# Altium PCB da12_v100.PcbDoc (part 5 of 5)
Units mil, origin at the board's own origin, x right, y up, seen from the top; angles counter-clockwise.
Board outline 4646.03 x 3622.4 mil, 4 copper layers (Top Layer, GND, POWER, Bottom Layer), stack 23.756 mil thick; 376 components, 191 nets, 1000 pads, 352 vias.
Unrouted connection lines stored in the file: 152.
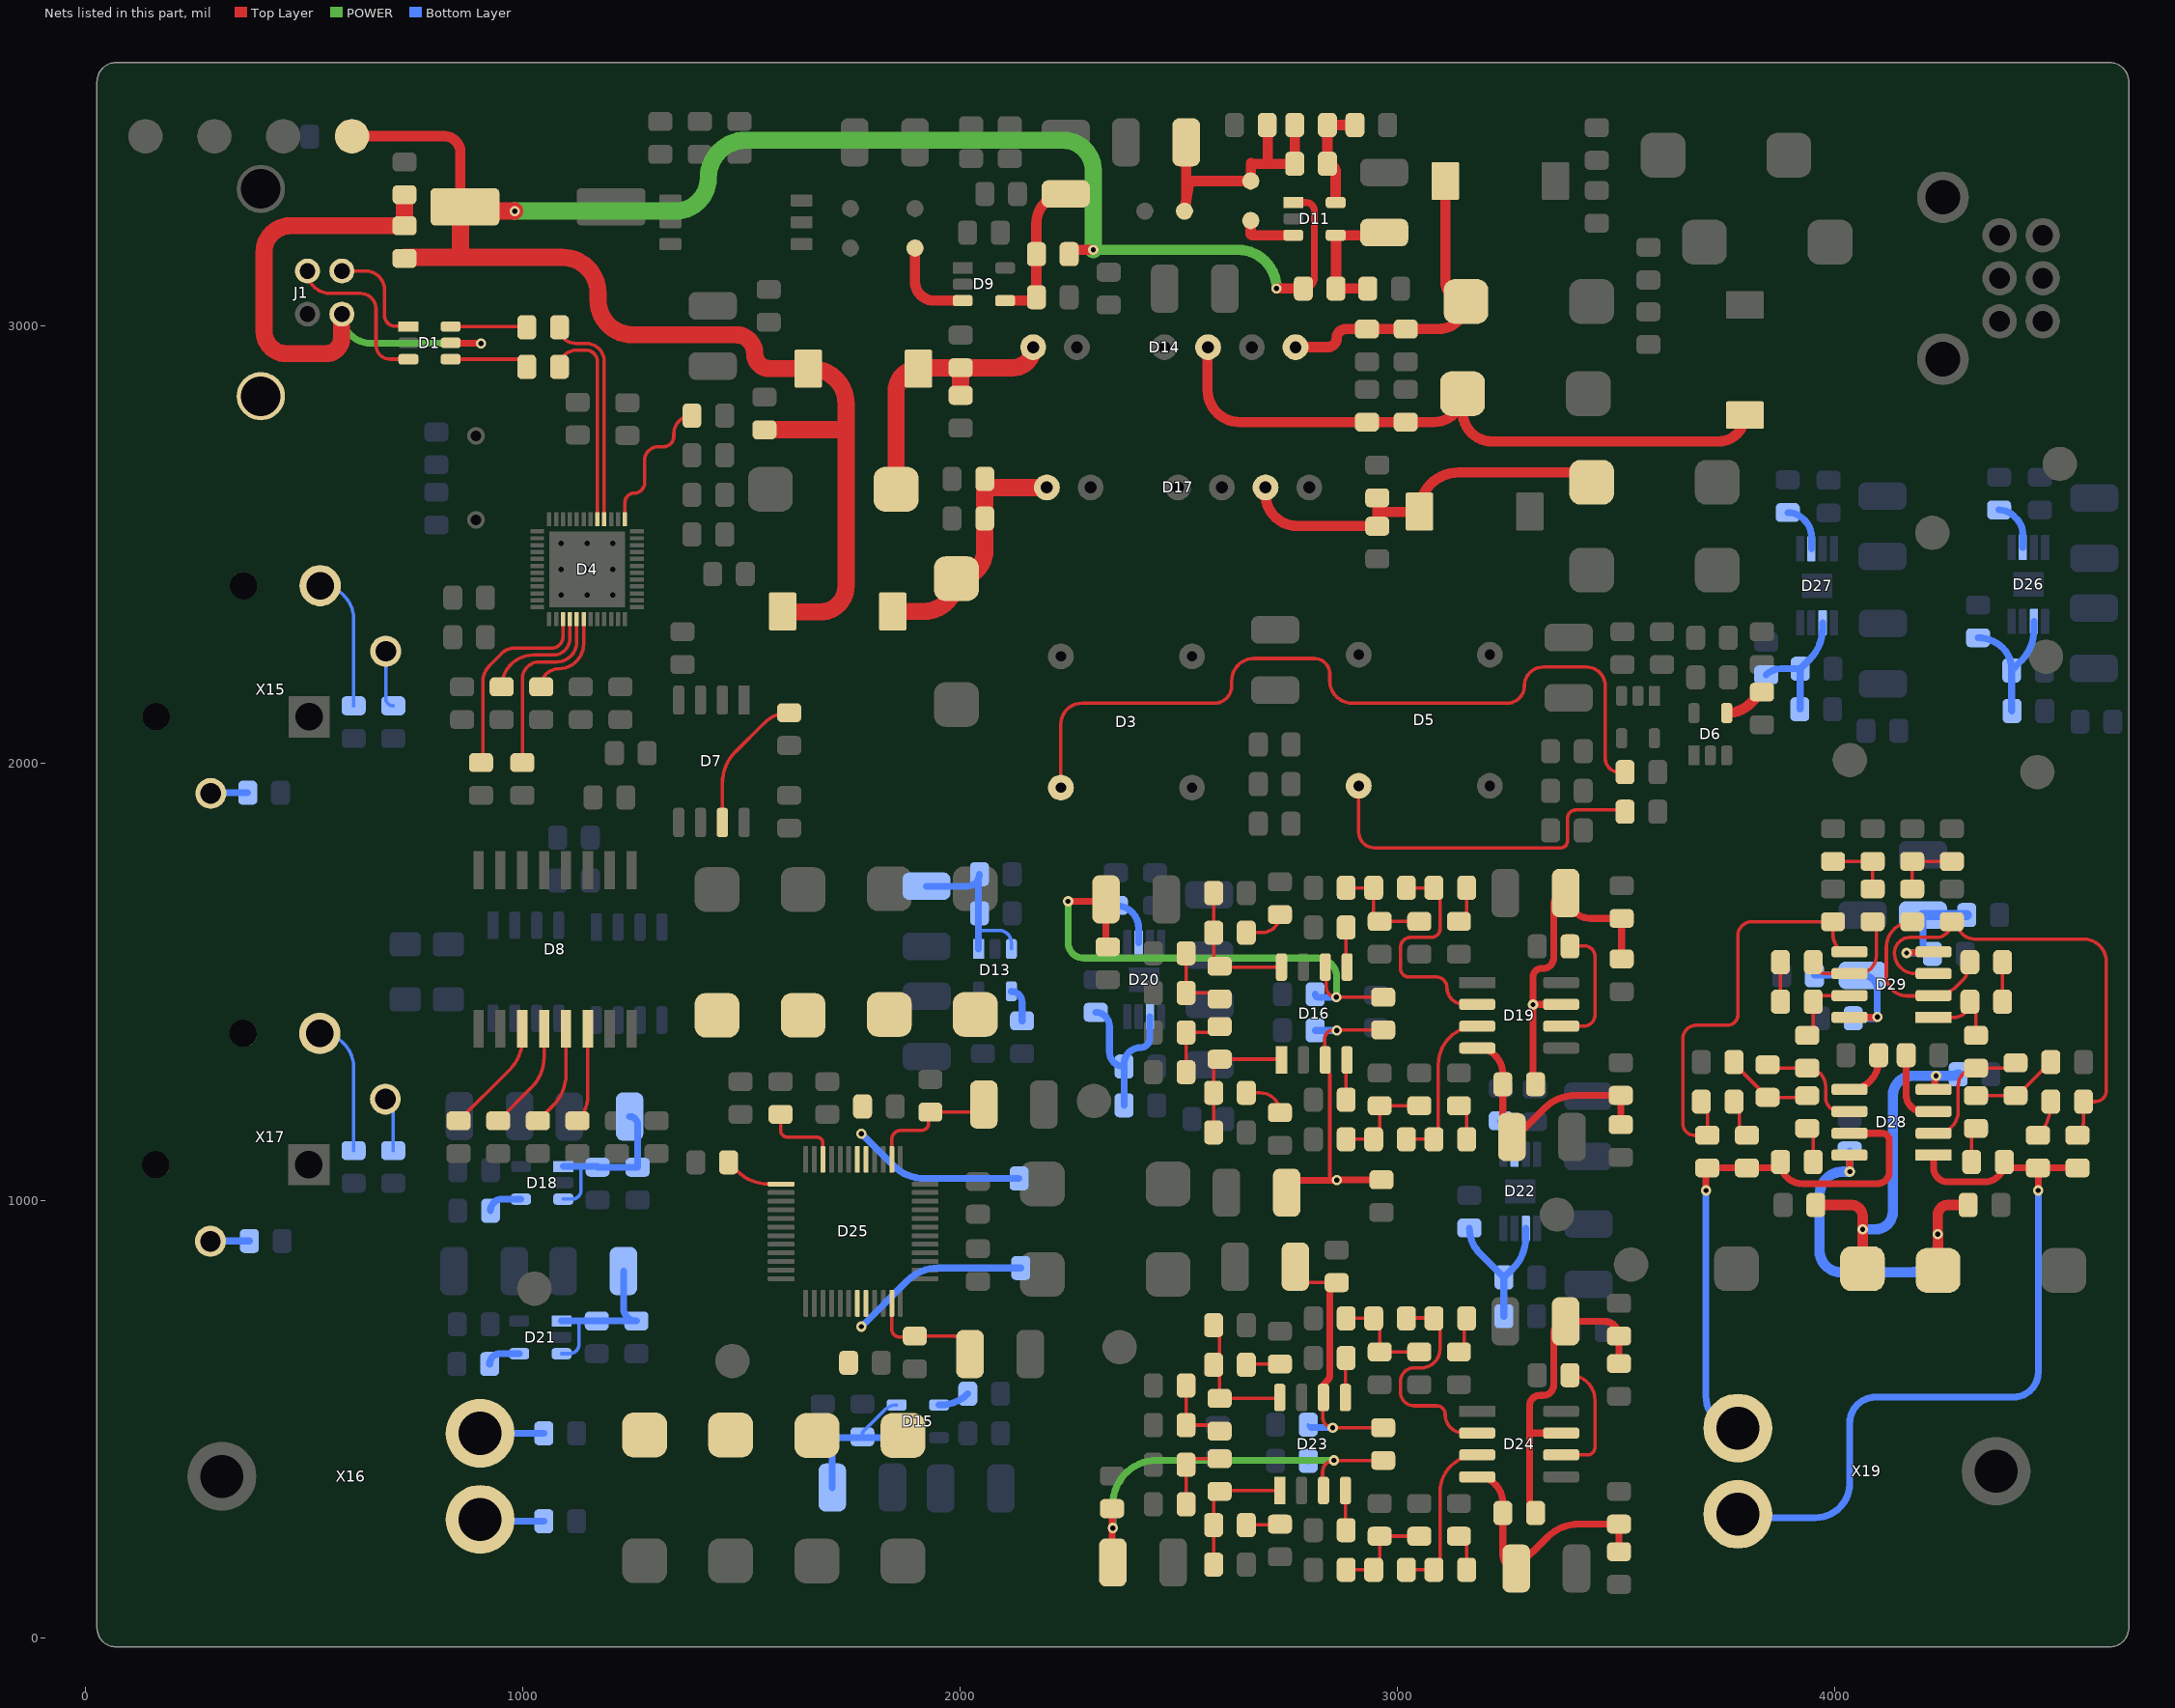
[diagram p5: the nets of this part, all layers, seen from the top]

## Via types
v1: diameter 23.62, hole 11.81, Top Layer to Bottom Layer, tented both sides, 218 vias
v2: diameter 23.62, hole 11.81, Top Layer to Bottom Layer, 134 vias

## Nets (pads, with @x,y where several pads share a name; then routed paths per layer and width w, separated by ;. In a path a pad name is that pad's centre, name@x,y a point inside that pad or via, vN(x,y) a via of type N, cw(c..) or ccw(c..) an arc to the next point about the centre after c; other vN are vias at no path point) (continued)
NetC36_1: C36.1 C37.2 D9.4 L9.1 | length 350.6
  Top Layer w23.62: D9.4@2103.94,3058.27 2167.72,3058.27 ccw(c2167.72,3066.14) C37.2@2175.59,3066.14 L9.1@2175.59,3164.57 2175.59,3235.43 cw(c2242.52,3235.43) C36.1@2242.52,3302.36
NetC38_1: C38.1 C39.2 C40.2 L10.2 L11.1 R32.1 | length 687.2
  Top Layer w23.62: C38.1@2518.11,3420.47 2518.11,3331.89 2518.11,3285.95 ccw(c2583.07,3262.99) L10.2@2514.17,3262.99 2525.99,3331.89 L11.1@2665.75,3331.89 2665.75,3371.26 2665.75,3372.6 ccw(c2668.11,3374.02) 2668.11,3371.26 2704.72,3371.26 ; C39.2@2703.15,3459.84 cw(c2703.15,3458.27) 2704.72,3458.27 2704.72,3371.26 ; C40.2@2766.14,3459.84 R32.1@2766.14,3371.26 2704.72,3371.26
NetC40_1: C40.1 D11.5 R31.1 R32.2 | length 250.9
  Top Layer w23.62: D11.5@2859.84,3282.68 2859.84,3352.36 ccw(c2840.94,3352.36) R32.2@2840.94,3371.26 C40.1@2840.94,3459.84 R31.1@2903.94,3459.84
NetC43_1: C43.1 C44.2 D11.4 L12.1 | length 309.7
  Top Layer w23.62: C44.2@2933.46,3085.83 L12.1@2860.63,3085.83 2860.63,3207.09 ccw(c2859.84,3207.09) D11.4@2859.84,3207.87 2964.96,3207.87 ccw(c2964.96,3213.78) C43.1@2970.87,3213.78
NetC45_1: C45.1 C46.1 C47.1 D14.7 L13.1 | length 751.9
  Top Layer w23.62: D14.7@2768.11,2951.97 2841.73,2951.97 ccw(c2841.73,2972.44) 2862.2,2972.44 cw(c2883.07,2972.44) 2883.07,2993.31 C46.1@2931.5,2993.31 C47.1@3020.08,2993.31 3094.88,2993.31 ccw(c3094.88,3056.3) C45.1@3157.87,3056.3 cw(c3157.87,3103.54) 3110.63,3103.54 L13.1@3110.63,3331.89
NetC50_2: C50.2 C53.2 C72.1 D16.6 R34.2 | length 1242.4
  Top Layer w7.87: D16.6@2836.02,1534.53 cw(c2836.02,1531.97) 2838.58,1531.97 2838.58,1488.19 ccw(c2861.14,1488.19) v1(2861.14,1465.63) C72.1@2968.5,1465.63
  Top Layer w15.75: v1(2248.03,1685.04) 2330.71,1685.04 ccw(c2330.71,1688.98) C53.2@2334.65,1688.98 2334.65,1584.65 ccw(c2338.58,1584.65) R34.2@2338.58,1580.71
  POWER w15.75: v1(2248.03,1685.04) 2248.03,1590.55 ccw(c2283.46,1590.55) 2283.46,1555.12 2818.9,1555.12 cw(c2818.9,1511.81) 2862.2,1511.81 2862.2,1466.69 cw(c2861.14,1466.69) v1(2861.14,1465.63)
  Bottom Layer w15.75: C50.2@2812.99,1472.44 ccw(c2819.8,1472.44) 2819.8,1465.63 v1(2861.14,1465.63)
NetC52_1: C52.1 C54.1 C89.1 D19.7 R33.2 | length 801.3
  Top Layer w15.75: C89.1@3316.93,1266.81 cw(c3331.19,1281.07) 3311.02,1281.07 v1(3311.02,1448.82) ; D19.7@3375.59,1449.29 3312.16,1449.29 ccw(c3312.16,1447.68) v1(3311.02,1448.82) ; C54.1@3513.78,1553.15 R33.2@3513.78,1645.67 3443.98,1645.67 cw(c3443.98,1703.82) C52.1@3385.83,1703.82 ccw(c3385.83,1676.26) 3358.27,1676.26 3358.27,1555.12 cw(c3334.65,1555.12) 3334.65,1531.5 3330.71,1531.5 ccw(c3330.71,1511.81) 3311.02,1511.81 v1(3311.02,1448.82)
NetC55_1: C55.1 C61.1 D13.1 D13.3 L15.2 | length 405
  Bottom Layer w7.87: 2043.31,1614.17 cw(c2047.24,1614.17) 2047.24,1618.11 2090.55,1618.11 cw(c2090.55,1590.55) 2118.11,1590.55 D13.3@2118.11,1575.98
  Bottom Layer w15.75: C61.1@1924.21,1719.49 2017.72,1719.49 ccw(c2017.72,1747.05) L15.2@2043.31,1736.82 ; D13.1@2043.31,1575.98 2043.31,1614.17 L15.2@2043.31,1736.82 ; L15.2@2045.28,1747.05 cw(c2017.72,1747.05) L15.2@2043.31,1736.82
NetC57_1: C57.1 C59.1 C60.1 D14.1 L14.2 | length 658.1
  Top Layer w39.37: C57.1@1854.72,2627.17 1854.72,2851.57 cw(c1905.91,2851.57) L14.2@1905.91,2902.76 cw(c1907.87,2902.76) 1907.87,2904.72 C59.1@2002.36,2904.72 ; C60.1@2002.36,2841.73 C59.1@2002.36,2904.72 ; D14.1@2168.11,2951.97 cw(c2120.87,2951.97) 2120.87,2904.72 C59.1@2002.36,2904.72
NetC58_1: C58.1 D13.4 | length 81.8
  Bottom Layer w15.75: D13.4@2118.11,1479.13 cw(c2118.11,1454.53) 2142.72,1454.53 C58.1@2142.72,1411.42
NetC63_2: C63.2 C64.2 C69.2 D14.5 L16.1 | length 1520.6
  Top Layer w23.62: D14.5@2568.11,2951.97 ccw(c2568.11,2950.79) 2566.93,2950.79 2566.93,2854.33 ccw(c2640.55,2854.33) 2640.55,2780.71 C63.2@2931.5,2780.71 C64.2@3020.08,2780.71 3085.04,2780.71 ccw(c3085.04,2845.67) C69.2@3150,2845.67 3150,2804.72 ccw(c3218.5,2804.72) 3218.5,2736.22 3735.43,2736.22 ccw(c3735.43,2796.46) L16.1@3795.67,2796.46
NetC68_1: C68.1 R38.2 | length 100.4
  Top Layer w7.87: R38.2@2655.51,1613.27 2690.94,1613.27 ccw(c2690.94,1654.61) C68.1@2732.28,1654.61
NetC70_1: C70.1 R35.2 R36.1 | length 175.2
  Top Layer w7.87: C70.1@2517.72,1566.02 R35.2@2517.72,1475.47 2580.71,1475.47 cw(c2580.71,1461.69) R36.1@2594.49,1461.69
NetC71_1: C71.1 R42.2 | length 86.9
  Top Layer w7.87: C71.1@3141.73,1638.86 ccw(c3141.73,1656.57) 3159.45,1656.57 R42.2@3159.45,1715.63
NetC72_2: C72.2 C100.1 C102.1 D16.3 R55.2 | length 755.2
  Top Layer w7.87: C100.1@2748.03,1018.78 cw(c2776.5,1018.78) C100.1@2776.5,1047.24 ; 2846.46,1047.24 2846.46,1289.23 ccw(c2838.58,1289.19) 2845.07,1293.66 2843.91,1295.34 cw(c2850.39,1299.81) 2842.52,1299.77 2842.52,1312.17 ccw(c2834.65,1312.17) 2840.21,1317.74 D16.3@2836.02,1321.93 cw(c2836.02,1323.31) 2834.65,1323.31 2834.65,1370.08 cw(c2855.39,1370.08) 2855.39,1390.83 C72.2@2968.5,1390.83 ; v1(2862.2,1047.24) cw(c2863.27,1047.24) v1@2863.27,1048.31
  Top Layer w15.75: C100.1@2776.5,1047.24 2846.46,1047.24 v1(2862.2,1047.24) ; v1@2863.27,1048.31 R55.2@2964.57,1048.31
  Bottom Layer w15.75: C102.1@2812.99,1389.76 v1(2862.2,1389.76)
NetC73_1: C73.1 C74.1 C75.1 D17.6 L17.1 | length 932.3
  Top Layer w23.62: D17.6@2699.61,2631.1 2699.61,2615.35 ccw(c2771.65,2615.35) 2771.65,2543.31 2954.33,2543.31 cw(c2954.33,2542.52) C75.1@2955.12,2542.52 2955.12,2575 ; C74.1@2955.12,2607.48 2955.12,2575 ; C73.1@3445.28,2642.91 ccw(c3422.83,2642.91) 3422.83,2665.35 3140.94,2665.35 ccw(c3140.94,2575) 3050.59,2575 2955.12,2575
NetC78_1: C78.1 C82.1 D15.1 D15.3 L18.2 | length 404
  Bottom Layer w7.87: C78.1@1777.56,460.63 1777.56,467.21 cw(c1785.43,467.21) 1779.89,472.81 1829.61,522.52 cw(c1856.07,495.99) D15.3@1856.07,533.46
  Bottom Layer w15.75: C82.1@1708.66,344.49 1708.66,408.35 ccw(c1634.73,408.35) L18.2@1687.01,460.63 ccw(c1691.76,465.38) 1691.76,458.66 1777.56,458.66 D15.1@1856.07,458.66
NetC81_1: C81.1 D15.4 | length 72.6
  Bottom Layer w15.75: D15.4@1952.92,533.46 1956.92,533.46 ccw(c1956.92,620.84) C81.1@2018.7,559.05
NetC85_2: C85.2 R50.2 R51.1 | length 175.2
  Top Layer w7.87: C85.2@2517.72,1294.37 R50.2@2517.72,1384.92 2580.71,1384.92 ccw(c2580.71,1398.7) R51.1@2594.49,1398.7
NetC86_1: C86.1 C87.1 C88.1 D17.1 L19.2 | length 575.7
  Top Layer w39.37: L19.2@1846.85,2347.64 1917.72,2347.64 ccw(c1917.72,2422.44) C86.1@1992.52,2422.44 ccw(c1992.52,2487.4) 2057.48,2487.4 C88.1@2057.48,2560.24 2057.48,2629.92 cw(c2058.66,2629.92) 2058.66,2631.1 D17.1@2199.61,2631.1
NetC89_2: C89.2 C101.2 C103.2 D19.4 R56.2 | length 599
  Top Layer w15.75: D19.4@3183.46,1349.29 cw(c3183.46,1290.63) 3242.13,1290.63 C89.2@3242.13,1266.81 3242.13,1166.42 ccw(c3262.72,1166.42) C103.2@3262.72,1145.83 ccw(c3262.72,1167.78) 3278.24,1152.26 3337.92,1211.93 cw(c3408.63,1141.22) 3408.63,1241.22 C101.2@3511.81,1241.22 R56.2@3511.81,1174.29
NetC90_1: C90.1 C96.1 D18.1 D18.3 L20.2 | length 405.6
  Bottom Layer w7.87: D18.3@1093.7,1003.94 1114.17,1003.94 ccw(c1114.17,1023.62) 1133.86,1023.62 1133.86,1076.87 ccw(c1131.99,1076.87) 1131.99,1078.74
  Bottom Layer w15.75: D18.1@1093.7,1078.74 1131.99,1078.74 1170.28,1078.74 cw(c1170.28,1076.77) C90.1@1172.24,1076.77 L20.2@1263.78,1076.77 1263.78,1174.21 ccw(c1245.08,1174.21) C96.1@1245.08,1192.91
NetC91_1: C91.1 R49.2 | length 102.6
  Top Layer w7.87: R49.2@2655.51,1247.13 2687.01,1247.13 cw(c2687.01,1201.85) C91.1@2732.28,1201.85
NetC92_1: C92.1 R47.2 | length 86.9
  Top Layer w7.87: C92.1@3141.73,1217.6 cw(c3141.73,1199.88) 3159.45,1199.88 R47.2@3159.45,1140.83
NetC94_1: C94.1 D18.4 | length 84.9
  Bottom Layer w15.75: C94.1@927.17,977.36 cw(c953.74,977.36) 953.74,1003.94 D18.4@996.85,1003.94
NetC95_1: C95.1 R45.2 R46.1 R53.1 | length 238.2
  Top Layer w7.87: R45.2@2883.86,1140.83 R46.1@2946.85,1140.83 ccw(c2946.85,1154.61) 2960.63,1154.61 C95.1@2960.63,1217.6 R53.1@3051.18,1217.6
NetC98_2: C98.2 D20.2 R54.1 R57.2 | length 397.6
  Bottom Layer w15.75: R57.2@2311.02,1431.1 cw(c2311.02,1399.61) 2342.52,1399.61 2342.52,1340.55 ccw(c2375.98,1340.55) C98.2@2375.98,1307.09 ; R54.1@2375.98,1218.5 C98.2@2375.98,1307.09 ; D20.2@2435.04,1421.26 2435.04,1372.05 cw(c2413.39,1372.05) 2413.39,1350.39 ccw(c2413.39,1312.99) 2375.98,1312.99 C98.2@2375.98,1307.09
NetC107_1: C107.1 D20.6 | length 114.4
  Bottom Layer w15.75: C107.1@2357.28,1675.2 cw(c2357.28,1623.03) 2409.45,1623.03 D20.6@2409.45,1590.55
NetC108_1: C108.1 C111.1 D21.1 D21.3 L21.2 | length 407.3
  Bottom Layer w7.87: D21.3@1089.76,650.59 1107.28,650.59 ccw(c1107.28,673.23) 1129.92,673.23 1129.92,725.39
  Bottom Layer w15.75: D21.1@1089.76,725.39 1129.92,725.39 L21.2@1260.83,725.39 ; C111.1@1231.3,839.57 1231.3,754.92 ccw(c1260.83,754.92) L21.2@1260.83,725.39 ; L21.2@1260.83,725.39 ccw(c1260.83,754.92) L21.2@1260.83,725.39 L21.2@1260.83,725.39
NetC110_1: C110.1 D21.4 | length 81.2
  Bottom Layer w15.75: C110.1@925.2,626.97 cw(c948.82,626.97) 948.82,650.59 D21.4@992.91,650.59
NetC113_2: C113.2 D22.2 R58.1 R61.2 | length 359.5
  Bottom Layer w15.75: R61.2@3165.76,937.93 ccw(c3248.93,937.93) 3190.12,879.12 C113.2@3244.5,824.74 ; R58.1@3244.5,736.16 C113.2@3244.5,824.74 ; D22.2@3294.7,936.95 3294.7,916.36 cw(c3194.7,916.36) 3265.41,845.65 C113.2@3244.5,824.74
NetC115_2: C115.2 C118.2 C127.1 D23.6 R60.2 | length 649.8
  Top Layer w7.87: C118.2@2767.72,849.49 ccw(c2804.21,849.49) 2804.21,812.99 R60.2@2862.2,812.99 ; D23.6@2832.09,550.28 ccw(c2832.09,548.9) 2830.71,548.9 2830.71,503.94 ccw(c2853.27,503.94) v1(2853.27,481.38) C127.1@2968.5,481.38
  Top Layer w15.75: D23.6@2832.09,550.28 2829.62,555.32 2829.59,555.37 cw(c2843.76,562.24) 2828.05,561.18 cw(c2859.9,563.23) 2838.57,586.96 2841.32,589.46 ccw(c2830.71,601.1) 2846.46,601.1 2846.46,797.24 cw(c2862.2,797.24) 2846.95,801.16 ccw(c2831.66,804.92) 2846.98,801.28 R60.2@2862.2,812.99
  Bottom Layer w7.87: C115.2@2797.24,488.19 ccw(c2804.06,488.19) C115.2@2804.06,481.38
  Bottom Layer w15.75: C115.2@2804.06,481.38 v1(2853.27,481.38)
NetC117_1: C117.1 C120.1 C130.1 D24.7 R59.2 | length 770.1
  Top Layer w15.75: C130.1@3316.93,286.5 3307.76,295.66 3307.73,295.7 cw(c3318.9,306.8) 3303.15,306.8 3303.15,468.98 3303.15,469.45 ; D24.7@3375.59,468.98 3306.92,468.98 cw(c3306.98,484.72) 3303.15,469.45 ; C120.1@3507.87,627.95 R59.2@3507.87,690.94 ccw(c3474.41,690.94) 3474.41,724.41 C117.1@3385.83,724.41 ccw(c3385.83,696.85) 3358.27,696.85 3358.27,578.74 cw(c3334.65,578.74) 3334.65,555.12 3326.77,555.12 ccw(c3326.77,531.5) 3303.15,531.5 3303.15,469.45
NetC122_1: C122.1 D22.6 | length 94.7
  Bottom Layer w15.75: C122.1@3237.61,1183.01 cw(c3237.61,1151.51) 3269.11,1151.51 D22.6@3269.11,1106.24
NetC123_1: C123.1 R65.2 | length 77.9
  Top Layer w7.87: R65.2@2655.51,625.08 cw(c2657.48,625.08) 2657.48,627.05 C123.1@2732.28,627.05
NetC124_1: C124.1 R62.2 R63.1 | length 165.5
  Top Layer w7.87: R62.2@2500.91,487.28 R62.2@2517.72,487.28 2580.71,487.28 cw(c2580.71,473.5) R63.1@2594.49,473.5 ; R62.2@2517.72,513.78 C124.1@2517.72,577.83
NetC125_2: C125.2 R66.1 R68.2 R70.1 | length 238.2
  Top Layer w7.87: R68.2@2883.86,731.38 R70.1@2946.85,731.38 cw(c2946.85,717.6) 2960.63,717.6 C125.2@2960.63,654.61 R66.1@3051.18,654.61
NetC126_1: C126.1 R69.2 | length 82.3
  Top Layer w7.87: C126.1@3141.73,654.61 3151.47,664.34 ccw(c3145.9,669.91) 3153.77,669.91 3153.77,713.78 R69.2@3159.45,731.38
NetC127_2: C127.2 C136.1 C139.1 D23.3 R82.2 | length 998.6
  Top Layer w7.87: D23.3@2832.09,337.68 cw(c2832.09,339.82) 2829.94,339.82 2829.94,380.38 cw(c2856.13,380.38) v1(2856.13,406.57) C127.2@2968.5,406.57
  Top Layer w15.75: R82.2@2348.43,296.34 2348.43,175.2 ccw(c2350.39,175.2) C136.1@2350.39,173.23
  POWER w15.75: v1(2350.39,251.97) 2350.39,306.57 cw(c2450.39,306.57) 2450.39,406.57 v1(2856.13,406.57)
  Bottom Layer w15.75: C139.1@2797.24,405.51 cw(c2798.31,405.51) 2798.31,406.57 v1(2856.13,406.57)
NetC129_2: C129.2 R78.2 R79.1 | length 175.2
  Top Layer w7.87: C129.2@2517.72,306.18 R78.2@2517.72,396.73 cw(c2531.5,396.73) 2531.5,410.51 R79.1@2594.49,410.51
NetC130_2: C130.2 C137.2 C140.2 D24.4 R84.2 | length 596.3
  Top Layer w15.75: D24.4@3183.46,368.98 cw(c3183.46,310.31) 3242.13,310.31 C130.2@3242.13,286.5 3242.13,190.04 ccw(c3272.72,190.04) C140.2@3272.72,159.45 3344.88,231.62 cw(c3415.59,160.91) 3415.59,260.91 C137.2@3507.87,260.91 R84.2@3507.87,197.91
NetC131_1: C131.1 R76.2 | length 77.9
  Top Layer w7.87: R76.2@2655.51,258.94 2730.32,258.94 ccw(c2730.32,260.91) C131.1@2732.28,260.91
NetC132_1: C132.1 R74.2 | length 86.9
  Top Layer w7.87: C132.1@3141.73,233.35 cw(c3141.73,215.63) 3159.45,215.63 R74.2@3159.45,156.57
NetC133_1: C133.1 R72.2 R73.1 R81.1 | length 238.2
  Top Layer w7.87: R72.2@2883.86,156.57 R73.1@2946.85,156.57 ccw(c2946.85,170.35) 2960.63,170.35 C133.1@2960.63,233.35 R81.1@3051.18,233.35
NetC134_2: C134.2 C135.1 C138.1 C141.1 C142.1 D25.41 D25.42 R77.1 | length 398.3
  Bottom Layer w15.75: v1(1775.59,1153.54) 1848.66,1080.47 ccw(c1919.37,1151.18) 1919.37,1051.18 R77.1@2135.83,1051.18
NetC145_2: C145.2 D25.1 | length 136.6
  Top Layer w7.87: C145.2@1471.42,1088.11 1491.78,1067.75 ccw(c1562.49,1138.46) 1562.49,1038.46 D25.1@1591.73,1038.46
NetC150_1: C150.1 C151.1 C152.1 C153.1 C154.1 D25.19 D25.20 R97.2 | length 415.3
  Bottom Layer w15.75: v1(1775.59,712.6) 1880.16,817.17 cw(c1950.87,746.46) 1950.87,846.46 R97.2@2139.76,846.46
NetC155_2: C155.2 D26.2 R98.1 R99.2 | length 341.7
  Bottom Layer w15.75: R99.2@4328.74,2287.4 cw(c4328.74,2206.61) 4385.87,2263.74 cw(c4338.44,2216.31) 4405.51,2216.31 C155.2@4405.51,2212.6 ; R98.1@4406.5,2120.08 cw(c4408.87,2122.45) 4405.51,2122.45 C155.2@4405.51,2212.6 ; D26.2@4456.69,2324.8 4456.69,2305.2 cw(c4356.69,2305.2) 4427.4,2234.49 C155.2@4405.51,2212.6
NetC160_1: C160.1 D26.6 | length 115.5
  Bottom Layer w15.75: C160.1@4376.97,2579.72 cw(c4376.97,2532.2) 4410.56,2565.81 4417.32,2559.06 cw(c4384.06,2525.79) 4431.1,2525.79 D26.6@4431.1,2494.09
NetC161_2: C161.2 D27.2 R101.1 R102.2 | length 296.4
  Bottom Layer w15.75: R102.2@3844.49,2202.76 cw(c3877.76,2169.49) 3877.76,2216.54 C161.2@3922.24,2216.54 ; R101.1@3921.26,2124.02 ccw(c3918.88,2126.39) 3922.24,2126.39 C161.2@3922.24,2216.54 ; D27.2@3973.43,2321.85 3973.43,2309.14 cw(c3873.43,2309.14) 3944.14,2238.43 C161.2@3922.24,2216.54
NetC166_1: C166.1 D27.6 | length 112.9
  Bottom Layer w15.75: C166.1@3893.7,2573.82 cw(c3893.7,2523.92) 3928.99,2559.2 3933.07,2555.12 cw(c3897.43,2519.48) 3947.83,2519.48 D27.6@3947.83,2491.14
NetC167_1: C167.1 D29.3 R103.1 R115.2 | length 1132.7
  Top Layer w7.87: D29.3@4227.13,1519.52 4185.23,1519.52 cw(c4185.11,1566.87) 4137.76,1566.92 cw(c4173.25,1566.87) 4173.25,1602.36 4233,1602.36 ccw(c4233,1638.22) R115.2@4268.86,1638.22 4274.09,1638.22 cw(c4274.09,1630.35) 4281.86,1631.66 ccw(c4321.11,1638.22) 4321.11,1598.43 4570.87,1598.43 cw(c4570.87,1547.24) 4622.05,1547.24 4622.05,1251.97 cw(c4596.88,1251.97) 4596.88,1226.8 C167.1@4570.04,1226.81 4570.04,1183.3 cw(c4523,1183.3) R103.1@4556.26,1150.03
NetC167_2: C167.2 R104.1 | length 84.7
  Top Layer w7.87: R104.1@4465.71,1150.03 4465.95,1150.27 ccw(c4395.24,1220.98) 4495.24,1220.98 C167.2@4495.24,1226.81
NetC168_1: C168.1 C187.1 R11.2 | length 202.7
  Top Layer w7.87: C168.1@4323.98,1240.58 C187.1@4414.53,1240.58 ccw(c4414.53,1250.09) 4421.25,1243.37 R11.2@4495.24,1317.36
NetC168_2: C168.2 R105.1 | length 82.4
  Top Layer w7.87: R105.1@4314.14,1089.01 4314.14,1155.94 cw(c4323.98,1155.94) C168.2@4323.98,1165.78
NetC169_1: C169.1 D29.2 R113.2 | length 415.1
  Top Layer w7.87: R113.2@4178.31,1638.22 4160.71,1635.55 ccw(c4178.31,1579.01) 4119.09,1579.01 4119.09,1515.75 ccw(c4166.34,1515.75) 4166.34,1468.5 4226.11,1468.5 ccw(c4226.11,1469.52) D29.2@4227.13,1469.52 ccw(c4227.13,1546.2) 4281.35,1491.98 4292.61,1503.24 ccw(c4250.15,1545.7) C169.1@4310.2,1545.7
NetC169_2: C169.2 R107.1 | length 90.6
  Top Layer w7.87: R107.1@4385,1455.15 C169.2@4385,1545.7
NetC170_1: C170.1 R112.2 R113.1 | length 153.5
  Top Layer w7.87: R113.1@4178.31,1713.03 R112.2@4178.31,1776.02 C170.1@4268.86,1776.02
NetC171_1: C171.1 C173.1 D28.8 R106.1 | length 879.8
  Top Layer w15.75: D28.8@4035,1104.56 4035.43,1104.56 v1(4035.43,1066.93)
  Top Layer w23.62: v1(4236.57,923.75) 4236.57,966.96 cw(c4260.19,966.96) 4260.19,990.58 R106.1@4306.26,990.58 ; C173.1@4237.37,840.98 v1@4237.37,923.75
  Bottom Layer w15.75: v1(4035.43,1066.93) C171.1@4035.43,1114.17
  Bottom Layer w23.62: v1(4035.43,1066.93) 4019.68,1066.93 ccw(c4019.68,1013.78) 3966.54,1013.78 3966.54,885.83 ccw(c4015.75,885.83) 4015.75,836.61 4173.34,836.61 ccw(c4173.34,899.85) 4236.57,899.85 v1(4236.57,923.75)
NetC172_2: C172.2 C174.1 D28.4 R110.1 | length 807.3
  Top Layer w15.75: D28.4@4227.13,1254.56 4228.25,1259.48 cw(c4244,1259.48) 4228.47,1262.13 v1(4232.68,1285.86)
  Top Layer w23.62: R110.1@3957.84,990.58 4038.94,990.58 cw(c4038.94,964.57) 4064.96,964.57 v1(4064.96,935.04) 4064.96,845.74 cw(c4064.14,845.74) C172.2@4064.14,844.92
  Bottom Layer w23.62: v1(4064.96,935.04) 4094.49,935.04 ccw(c4094.49,974.41) 4133.86,974.41 4133.86,1240.16 cw(c4179.56,1240.16) 4179.56,1285.86 v1(4232.68,1285.86) 4273.62,1285.86 C174.1@4283.46,1289.37
NetC175_1: C175.1 C177.1 D29.8 R111.1 | length 345.5
  Top Layer w15.75: D29.8@4035,1419.52 4097.67,1419.52 ccw(c4097.67,1420.28) v1(4098.43,1420.28)
  Bottom Layer w15.75: R111.1@3954.72,1515.75 C177.1@4064.96,1515.75 cw(c4064.96,1482.28) 4098.43,1482.28 v1(4098.43,1420.28) cw(c4095.47,1420.28) 4095.47,1417.32 C175.1@4043.31,1417.32
NetC176_1: C176.1 C178.2 D29.4 R114.1 | length 292.4
  Top Layer w15.75: v1(4165.4,1566.88) 4187.1,1567.59 ccw(c4186.54,1583.32) 4190.66,1568.13 cw(c4194.78,1552.93) 4194.43,1568.67 4198.68,1568.78 4208.71,1569.04 D29.4@4227.13,1569.52
  Bottom Layer w15.75: v1(4165.4,1566.88) 4204.68,1566.88 ccw(c4204.68,1571.3) 4209.1,1571.3 cw(c4224.41,1586.61) 4202.76,1586.61 C178.2@4202.76,1653.54
  Bottom Layer w23.62: C178.2@4202.76,1653.54 R114.1@4303.15,1653.54
NetC179_1: C179.1 D29.5 R116.1 R124.2 | length 1018.2
  Top Layer w7.87: C179.1@3692.49,1226.81 C179.1@3696.03,1226.81 cw(c3696.03,1213.03) 3709.81,1213.03 R116.1@3709.81,1150.03 3709.81,1149.61 3681.1,1149.61 cw(c3681.1,1177.17) 3653.54,1177.17 3653.54,1370.08 cw(c3685.04,1370.08) 3685.04,1401.57 3755.91,1401.57 ccw(c3755.91,1425.2) 3779.53,1425.2 3779.53,1606.3 cw(c3811.45,1606.3) 3811.45,1638.22 R124.2@3997.21,1638.22 3997.21,1607.32 ccw(c4035,1607.32) D29.5@4035,1569.52
NetC179_2: C179.2 R117.1 | length 93.6
  Top Layer w7.87: C179.2@3770.83,1226.81 3770.83,1225.23 ccw(c3783.46,1225.23) 3783.46,1212.6 3783.46,1166.93 ccw(c3800.36,1166.93) R117.1@3800.36,1150.03
NetC180_1: C180.1 C188.1 R20.2 | length 204.9
  Top Layer w7.87: R20.2@3770.83,1317.36 ccw(c3780.33,1317.36) 3773.61,1310.64 C188.1@3847.6,1236.65 3934.22,1236.65 ccw(c3934.22,1240.58) C180.1@3938.15,1240.58
NetC180_2: C180.2 R118.1 | length 84.6
  Top Layer w7.87: C180.2@3938.15,1165.78 cw(c3938.15,1152) 3951.93,1152 R118.1@3951.93,1089.01
NetC181_1: C181.1 D29.6 R123.2 | length 265.1
  Top Layer w7.87: C181.1@3951.93,1545.7 ccw(c3978.11,1545.7) 3978.11,1519.52 D29.6@4035,1519.52 4055.39,1519.52 ccw(c4055.39,1560.2) 4096.06,1560.2 4096.06,1629.92 cw(c4096.06,1638.22) R123.2@4087.76,1638.22
NetC181_2: C181.2 R119.1 | length 90.6
  Top Layer w7.87: R119.1@3877.13,1455.15 C181.2@3877.13,1545.7
NetC182_1: C182.1 R122.2 R123.1 | length 153.5
  Top Layer w7.87: C182.1@3997.21,1776.02 R122.2@4087.76,1776.02 R123.1@4087.76,1713.03
NetC183_2: C183.2 R39.1 R41.2 R43.1 | length 238.2
  Top Layer w7.87: R41.2@2883.86,1715.63 R43.1@2946.85,1715.63 2946.85,1652.64 ccw(c2960.63,1652.64) C183.2@2960.63,1638.86 R39.1@3051.18,1638.86
NetC187_2: C187.2 D28.2 R108.2 | length 304.2
  Top Layer w7.87: D28.2@4227.13,1154.56 4233.3,1154.56 ccw(c4233.3,1204.72) 4283.46,1204.72 4283.46,1263.06 cw(c4323.98,1263.06) R108.2@4323.98,1303.58 4402.72,1303.58 ccw(c4402.72,1315.39) C187.2@4414.53,1315.39
NetC188_2: C188.2 D28.6 R120.2 | length 259.2
  Top Layer w7.87: C188.2@3847.6,1311.45 ccw(c3855.48,1311.45) 3855.48,1303.58 R120.2@3938.15,1303.58 cw(c3938.15,1261.41) 3980.32,1261.41 3980.32,1236.22 ccw(c4011.97,1236.22) 4011.97,1204.56 D28.6@4035,1204.56
NetD3_3: D3.3 R9.1 | length 1846.4
  Top Layer w7.87: D3.3@2231.5,1944.88 2231.5,2089.76 cw(c2279.53,2089.76) 2279.53,2137.8 2582.68,2137.8 ccw(c2582.68,2177.17) 2622.05,2177.17 2622.05,2188.98 cw(c2673.23,2188.98) 2673.23,2240.16 2811.02,2240.16 cw(c2811.02,2204.72) 2846.46,2204.72 2846.46,2188.98 ccw(c2897.64,2188.98) 2897.64,2137.8 3251.97,2137.8 ccw(c3251.97,2177.17) 3291.34,2177.17 cw(c3334.65,2177.17) 3334.65,2220.47 3433.07,2220.47 cw(c3433.07,2177.17) 3476.38,2177.17 3476.38,2011.83 ccw(c3507.87,2011.81) R9.1@3507.89,1980.31 ; R9.1@3507.93,1980.32 R9.1@3521.65,1980.32
NetD4_1: D4.1 R10.2 | length 339.3
  Top Layer w7.87: D4.1@1234.65,2558.27 1234.65,2596.85 cw(c1255.91,2596.85) 1255.91,2618.11 ccw(c1255.91,2641.73) 1279.53,2641.73 1279.53,2692.91 cw(c1311.02,2692.91) 1311.02,2724.41 1322.83,2724.41 ccw(c1322.83,2748.03) 1346.46,2748.03 1346.46,2753.94 cw(c1387.8,2753.94) R10.2@1387.8,2795.28 R10.2@1377.95,2795.28
NetD4_27: D4.27 R13.2 | length 464.8
  Top Layer w7.87: R13.2@905.51,2001.97 ccw(c896.01,2011.47) 909.45,2011.47 909.45,2185.04 cw(c966.48,2185.04) 926.15,2225.36 952.76,2251.97 cw(c981.27,2223.45) 981.27,2263.78 1066.93,2263.78 ccw(c1066.93,2289.76) 1092.91,2289.76 D4.27@1092.91,2329.92
NetD4_28: D4.28 R14.2 | length 263.1
  Top Layer w7.87: R14.2@952.76,2175.2 cw(c1025.59,2175.2) 1025.59,2248.03 1070.87,2248.03 ccw(c1070.87,2285.83) 1108.66,2285.83 D4.28@1108.66,2329.92
NetD4_29: D4.29 R15.2 | length 415.9
  Top Layer w7.87: R15.2@1000,2001.97 1000,2192.91 cw(c1039.37,2192.91) 1039.37,2232.28 1078.74,2232.28 ccw(c1078.74,2277.95) 1124.41,2277.95 D4.29@1124.41,2329.92
NetD4_30: D4.30 R16.2 | length 210
  Top Layer w7.87: R16.2@1043.31,2175.2 1043.31,2177.17 cw(c1082.68,2177.17) 1082.68,2216.54 ccw(c1082.68,2274.02) 1140.16,2274.02 D4.30@1140.16,2329.92
NetD5_3: D5.3 R12.1 | length 808.8
  Top Layer w7.87: D5.3@2912.6,1948.82 2912.6,1843.55 ccw(c2949.06,1843.55) 2949.06,1807.09 3374.02,1807.09 ccw(c3374.02,1822.83) 3389.76,1822.83 3389.76,1874.02 cw(c3409.45,1874.02) 3409.45,1893.7 3476.38,1893.7 3517.72,1893.7 cw(c3517.72,1889.76) R12.1@3521.65,1889.76
NetD6_4: D6.4 R17.1 | length 97.2
  Top Layer w23.62: D6.4@3753.94,2115.35 ccw(c3753.94,2194.24) 3809.72,2138.46 R17.1@3834.65,2163.39
NetD7_7: D7.7 R18.2 | length 326
  Top Layer w7.87: D7.7@1457.48,1865.2 1457.48,1955.43 cw(c1557.48,1955.43) 1486.77,2026.14 1553.11,2092.48 cw(c1610.24,2035.35) R18.2@1610.24,2116.14
NetD8_11: D8.11 R24.2 | length 266.6
  Top Layer w7.87: R24.2@854.33,1183.07 970.51,1299.25 ccw(c899.8,1369.96) 999.8,1369.96 D8.11@999.8,1393.7
NetD8_12: D8.12 R25.2 | length 249.8
  Top Layer w7.87: R25.2@944.88,1183.07 1020.51,1258.7 ccw(c949.8,1329.41) 1049.8,1329.41 D8.12@1049.8,1393.7
NetD8_13: D8.13 R26.2 | length 233
  Top Layer w7.87: R26.2@1035.43,1183.07 1070.51,1218.15 ccw(c999.8,1288.86) 1099.8,1288.86 D8.13@1099.8,1393.7
NetD8_14: D8.14 R27.2 | length 217
  Top Layer w7.87: R27.2@1125.98,1183.07 ccw(c1068.48,1240.57) 1149.8,1240.57 D8.14@1149.8,1393.7
NetD9_3: D9.3 L8.2 | length 211
  Top Layer w23.62: L8.2@1898.03,3178.35 1897.64,3178.35 1897.64,3102.36 ccw(c1941.73,3102.36) 1941.73,3058.27 D9.3@2007.09,3058.27
NetD11_3: D11.3 L11.2 | length 129.5
  Top Layer w23.62: L11.2@2665.75,3241.34 2665.35,3241.34 2665.35,3212.6 ccw(c2670.08,3212.6) 2670.08,3207.87 D11.3@2762.99,3207.87
NetD16_1: D16.1 R49.1 R51.2 R52.1 | length 317.8
  Top Layer w7.87: R52.1@2580.71,1156.57 R49.1@2580.71,1247.13 2580.71,1310.12 cw(c2594.49,1310.12) R51.2@2594.49,1323.9 2734.06,1323.9 cw(c2734.06,1321.93) D16.1@2736.02,1321.93
NetD16_4: D16.4 R48.2 | length 91.8
  Top Layer w7.87: R48.2@2883.86,1231.38 2883.86,1319.76 cw(c2886.02,1319.76) D16.4@2886.02,1321.93
NetD16_5: D16.5 R40.1 | length 91.8
  Top Layer w7.87: R40.1@2883.86,1625.08 2883.86,1536.69 ccw(c2886.02,1536.69) D16.5@2886.02,1534.53
NetD16_8: D16.8 R36.2 R37.1 R38.1 | length 317.8
  Top Layer w7.87: R37.1@2580.71,1703.82 R38.1@2580.71,1613.27 2580.71,1550.28 ccw(c2596.46,1550.28) 2596.46,1534.53 D16.8@2736.02,1534.53
NetD19_2: D19.2 R42.1 R43.2 | length 549.5
  Top Layer w7.87: R43.2@3021.65,1715.63 R42.1@3084.65,1715.63 cw(c3084.65,1701.85) 3098.43,1701.85 3098.43,1622.05 cw(c3078.74,1622.05) 3078.74,1602.36 3031.5,1602.36 ccw(c3031.5,1578.74) 3007.87,1578.74 3007.87,1531.5 ccw(c3027.56,1531.5) 3027.56,1511.81 3090.55,1511.81 cw(c3090.55,1488.19) 3114.17,1488.19 ccw(c3153.07,1488.19) 3153.07,1449.29 D19.2@3183.46,1449.29
NetD19_3: D19.3 R46.2 R47.1 | length 378.2
  Top Layer w7.87: R46.2@3021.65,1140.83 R47.1@3084.65,1140.83 ccw(c3084.65,1150.67) 3094.49,1150.67 3094.49,1311.02 cw(c3182.76,1311.02) 3182.76,1399.29 D19.3@3183.46,1399.29
NetD19_6: D19.6 R44.1 | length 296.9
  Top Layer w7.87: D19.6@3375.59,1399.29 3426.85,1399.29 ccw(c3426.85,1425.2) 3452.76,1425.2 3452.76,1559.06 ccw(c3429.13,1559.06) 3429.13,1582.68 3396.58,1582.68 ccw(c3396.58,1581.77) R44.1@3395.67,1581.77
NetD23_1: D23.1 R76.1 R79.2 R80.1 | length 313.9
  Top Layer w7.87: R80.1@2580.71,168.39 R76.1@2580.71,258.94 2580.71,321.93 cw(c2594.49,321.93) R79.2@2594.49,335.71 cw(c2596.46,335.71) 2596.46,337.68 D23.1@2732.09,337.68
NetD23_4: D23.4 R75.2 | length 91.6
  Top Layer w7.87: D23.4@2882.09,337.68 2882.09,248.9 ccw(c2883.86,248.9) R75.2@2883.86,247.13
NetD23_5: D23.5 R67.1 | length 91.6
  Top Layer w7.87: D23.5@2882.09,550.28 2882.09,639.05 cw(c2883.86,639.05) R67.1@2883.86,640.83
NetD23_8: D23.8 R63.2 R64.1 R65.1 | length 313.9
  Top Layer w7.87: R64.1@2580.71,715.63 cw(c2580.71,701.85) 2594.49,701.85 R63.2@2594.49,548.31 2730.12,548.31 ccw(c2730.12,550.28) D23.8@2732.09,550.28
NetD24_2: D24.2 R69.1 R70.2 | length 528
  Top Layer w7.87: R70.2@3021.65,731.38 3030.59,731.38 ccw(c3030.59,732.28) 3031.5,732.28 3083.74,732.28 cw(c3083.74,731.38) R69.1@3084.65,731.38 cw(c3084.65,717.6) 3098.43,717.6 3098.43,661.42 cw(c3055.12,661.42) 3055.12,618.11 3039.37,618.11 ccw(c3039.37,586.61) 3007.87,586.61 3007.87,562.99 ccw(c3039.37,562.99) 3039.37,531.5 3090.55,531.5 cw(c3090.55,511.81) 3110.24,511.81 ccw(c3153.07,511.81) 3153.07,468.98 D24.2@3183.46,468.98
NetD24_3: D24.3 R73.2 R74.1 | length 381.8
  Top Layer w7.87: R73.2@3021.65,156.57 R74.1@3084.65,156.57 ccw(c3084.65,170.35) 3098.43,170.35 3098.43,333.94 cw(c3183.46,333.94) D24.3@3183.46,418.98
NetD24_6: D24.6 R71.1 | length 284.5
  Top Layer w7.87: D24.6@3375.59,418.98 3434.72,418.98 ccw(c3434.72,437.01) 3452.76,437.01 3452.76,544.37 ccw(c3395.67,544.37) R71.1@3395.67,601.46
NetD25_46: D25.46 R83.2 | length 187.1
  Top Layer w7.87: R83.2@1590.55,1197.83 1590.55,1161.42 ccw(c1606.3,1161.42) 1606.3,1145.67 1673.23,1145.67 cw(c1673.23,1131.5) 1687.4,1131.5 D25.46@1687.4,1094.76
NetD28_3: D28.3 R109.2 | length 175.2
  Top Layer w15.75: R109.2@4164.53,1333.1 4164.53,1241.74 ccw(c4201.71,1241.74) 4201.71,1204.56 D28.3@4227.13,1204.56
NetD28_5: D28.5 R121.2 | length 116.5
  Top Layer w15.75: D28.5@4035,1254.56 ccw(c4035,1321.1) 4101.54,1321.1 R121.2@4101.54,1333.1
NetD29_1: D29.1 R107.2 R108.1 | length 188
  Top Layer w7.87: D29.1@4227.13,1419.52 4274.57,1419.52 ccw(c4274.57,1455.15) R107.2@4310.2,1455.15 cw(c4310.2,1441.37) 4323.98,1441.37 R108.1@4323.98,1378.38
NetD29_7: D29.7 R119.2 R120.1 | length 175.9
  Top Layer w7.87: R120.1@3938.15,1378.38 ccw(c3938.15,1392.16) 3951.93,1392.16 R119.2@3951.93,1455.15 cw(c3966.3,1455.15) 3966.3,1469.52 D29.7@4035,1469.52
NetR85_2: R85.2 X15.2 | length 318.5
  Bottom Layer w7.87: X15.2@537.6,2406.69 cw(c537.6,2330.12) 614.17,2330.12 R85.2@614.17,2131.89
NetR89_2: R89.2 X15.3 | length 134.6
  Bottom Layer w7.87: X15.3@687.6,2256.69 687.6,2149.02 ccw(c704.72,2149.02) R89.2@704.72,2131.89
NetR91_2: R91.2 X15.G | length 85.2
  Bottom Layer w15.75: X15.G@287.6,1931.69 cw(c288.98,1931.69) 288.98,1933.07 R91.2@372.05,1933.07
NetR92_2: R92.2 X16.2 | length 145.7
  Bottom Layer w15.75: X16.2@903.54,468.5 R92.2@1049.21,468.5
NetR93_2: R93.2 X17.2 | length 311.9
  Bottom Layer w7.87: X17.2@536.81,1382.68 cw(c536.81,1305.32) 614.17,1305.32 R93.2@614.17,1114.96
NetR94_2: R94.2 X17.3 | length 127.9
  Bottom Layer w7.87: X17.3@686.81,1232.68 cw(c686.81,1214.76) 704.72,1214.76 R94.2@704.72,1114.96
NetR95_2: R95.2 X17.G | length 89.8
  Bottom Layer w15.75: X17.G@286.81,907.68 286.81,908.27 R95.2@375.98,908.27
NetR96_2: R96.2 X16.3 | length 147.9
  Bottom Layer w15.75: X16.3@903.54,271.65 ccw(c907.48,271.65) 907.48,267.72 R96.2@1049.21,267.72
OUT_HA_L: D28.1 R103.2 R104.2 R105.2 X19.2 | length 1818
  Top Layer w15.75: D28.1@4227.13,1104.56 4227.13,1076.02 ccw(c4259.84,1076.02) 4259.84,1043.31 4343.24,1043.31 ccw(c4343.24,1089.01) R105.2@4388.94,1089.01 ccw(c4402.72,1089.01) 4402.72,1075.23 R104.2@4465.71,1075.23 ; v1(4466.54,1023.62) 4466.54,1073.24 ccw(c4463.72,1073.24) R104.2@4465.71,1075.23 ; R103.2@4556.26,1075.23 R104.2@4465.71,1075.23
  Bottom Layer w15.75: X19.2@3779.53,283.46 ccw(c3787.4,283.46) 3787.4,275.59 3956.69,275.59 ccw(c3956.69,354.33) 4035.43,354.33 4035.43,492.13 cw(c4094.49,492.13) 4094.49,551.18 4409.45,551.18 ccw(c4409.45,608.27) 4466.54,608.27 v1(4466.54,1023.62)
OUT_HA_R: D28.7 R116.2 R117.2 R118.2 X19.3 | length 1276.4
  Top Layer w15.75: v1(3706.69,1023.62) 3706.69,1063.54 R116.2@3709.81,1075.23 R117.2@3800.36,1075.23 3863.35,1075.23 ccw(c3863.35,1089.01) R118.2@3877.13,1089.01 ccw(c3926.77,1089.01) 3926.77,1039.37 4098.43,1039.37 ccw(c4098.43,1066.93) 4125.98,1066.93 4125.98,1137.8 ccw(c4109.22,1137.8) 4109.22,1154.56 D28.7@4035,1154.56
  Bottom Layer w15.75: v1(3706.69,1023.62) 3706.69,553.15 ccw(c3779.53,553.15) X19.3@3779.53,480.32
USB_5V0: C3.1 C4.1 D11.1 L1.2 L9.2 L12.2 L14.1 L19.1 X1.1 | length 5100.4
  Top Layer w15.75: D11.1@2762.99,3282.68 2792.13,3282.68 cw(c2792.13,3263.78) 2811.02,3263.78 2811.02,3111.02 cw(c2785.83,3111.02) L12.2@2785.83,3085.83
  Top Layer w23.62: X1.1@610.63,3434.25 821.65,3434.25 cw(c821.65,3397.64) 858.27,3397.64 858.27,3283.27 ccw(c868.7,3283.27) C4.1@868.7,3272.83 ; L9.2@2260.24,3174.41 v1(2305.49,3174.41) ; v1(2724.8,3085.83) L12.2@2785.83,3085.83
  Top Layer w39.37: L1.2@730.71,3154.72 cw(c733.46,3154.72) 733.46,3157.48 858.27,3157.48 ; v1(982.68,3262.99) 878.54,3262.99 cw(c878.54,3272.83) C4.1@868.7,3272.83 ccw(c868.7,3262.4) 858.27,3262.4 858.27,3157.48 ; C3.1@1553.54,2762.99 1733.07,2762.99 cw(c1733.07,2755.91) 1740.16,2755.91 ; L19.1@1594.88,2347.64 ccw(c1596.06,2347.64) 1596.06,2346.46 1681.1,2346.46 ccw(c1681.1,2405.51) 1740.16,2405.51 1740.16,2755.91 ; 858.27,3157.48 1090.55,3157.48 cw(c1090.55,3074.8) 1173.23,3074.8 1173.23,3059.06 ccw(c1251.97,3059.06) 1251.97,2980.32 1488.19,2980.32 cw(c1488.19,2937.01) 1531.5,2937.01 ccw(c1565.75,2937.01) 1565.75,2902.76 L14.1@1653.94,2902.76 1660.24,2902.76 cw(c1660.24,2822.83) 1740.16,2822.83 1740.16,2755.91
  POWER w23.62: v1(2305.49,3174.41) 2636.22,3174.41 cw(c2636.22,3085.83) v1(2724.8,3085.83)
  POWER w39.37: v1(982.68,3262.99) 1349.61,3262.99 ccw(c1349.61,3338.58) 1425.2,3338.58 cw(c1511.81,3338.58) 1511.81,3425.2 2236.22,3425.2 cw(c2236.22,3355.93) 2305.49,3355.93 v1(2305.49,3174.41)
USB_CONN_DM: D1.1 J1.2 | length 249.7
  Top Layer w7.87: J1.2@587.4,3125.98 641.73,3125.98 cw(c641.73,3082.68) 685.04,3082.68 685.04,3023.62 ccw(c708.66,3023.62) 708.66,3000 738.58,3000 cw(c738.58,2999.21) D1.1@739.37,2999.21
USB_CONN_DP: D1.3 J1.3 | length 381.3
  Top Layer w7.87: J1.3@508.66,3125.98 ccw(c559.84,3125.98) 559.84,3074.8 629.92,3074.8 cw(c629.92,3039.37) 665.35,3039.37 665.35,2956.69 ccw(c697.64,2956.69) 697.64,2924.41 D1.3@739.37,2924.41
USB_CONN_SHIELD: J1.5
USB_DM: D4.4 R8.2 | length 507.7
  Top Layer w7.87: R8.2@1085.04,2997.24 ccw(c1121.65,2997.24) 1121.65,2960.63 1145.67,2960.63 cw(c1145.67,2918.9) 1187.4,2918.9 D4.4@1187.4,2558.27
USB_DP: D4.5 R7.2 | length 483.9
  Top Layer w7.87: R7.2@1085.04,2906.69 cw(c1123.23,2906.69) 1123.23,2944.88 1145.67,2944.88 cw(c1145.67,2918.9) 1171.65,2918.9 D4.5@1171.65,2558.27
USB_PROT_DM: D1.6 R8.1 | length 175.1
  Top Layer w7.87: D1.6@836.22,2999.21 1008.27,2999.21 cw(c1008.27,2997.24) R8.1@1010.24,2997.24
USB_PROT_DP: D1.4 R7.1 | length 184.1
  Top Layer w7.87: D1.4@836.22,2924.41 992.52,2924.41 cw(c992.52,2906.69) R7.1@1010.24,2906.69
USB_VBUS: C1.1 D1.5 J1.1 L1.1 | length 1316.1
  Top Layer w15.75: D1.5@836.22,2961.81 ccw(c837.4,2961.81) 837.4,2960.63 v1(905.51,2960.63)
  Top Layer w39.37: J1.1@587.4,3027.56 ccw(c587.4,3026.77) 586.61,3026.77 586.61,2972.44 cw(c551.18,2972.44) 551.18,2937.01 460.63,2937.01 cw(c460.63,2988.19) 409.45,2988.19 409.45,3169.29 cw(c469.69,3169.29) 469.69,3229.53 L1.1@730.71,3229.53 C1.1@730.71,3300.39
  POWER w15.75: J1.1@587.4,3027.56 ccw(c654.33,3027.56) 654.33,2960.63 v1(905.51,2960.63)
VCM_L: C2.1 C185.1 D25.38 | length 310.8
  Top Layer w7.87: D25.38@1844.88,1094.76 1844.88,1140.16 cw(c1866.14,1140.16) 1866.14,1161.42 1913.39,1161.42 ccw(c1913.39,1177.17) 1929.13,1177.17 1929.13,1198.82 cw(c1933.07,1198.82) C185.1@1933.07,1202.76 2037.4,1202.76 ccw(c2037.4,1220.47) C2.1@2055.12,1220.47
VCM_R: C184.1 C186.1 D25.23 | length 272.7
  Top Layer w7.87: D25.23@1844.88,765.63 1844.88,706.3 ccw(c1862.2,706.3) 1862.2,688.98 1895.67,688.98 ccw(c1895.67,690.94) C186.1@1897.64,690.94 1982.28,690.94 cw(c1982.28,649.61) C184.1@2023.62,649.61
pads on no net: D2.1 D4. D4.19 D4.20 D4.21 D4.22 D4.43 D4.47 D8.7 D8.10 D14.4 D16.7 D17.5 D17.7 D19.1 D19.5 D19.8 D20.3 D20.7 D22.3 D22.7 D23.7 D24.1 D24.5 D24.8 D25.6 D25.7 D25.10 D25.11 D25.15 D25.18 D25.24 D25.37 D25.43 D26.3 D26.7 D27.3 D27.7 J1.6 R1.0 X15. X17.

## Polygon pours and split planes (outlines as drawn)
GND on Top Layer "GND_L01_P005" (solid, remove dead copper, pour order 5): 3574.8,1779.53 ccw(c3559.06,1779.53) 3559.06,1795.28 3555.12,1795.28 2248.03,1795.28 ccw(c2248.03,1775.59) 2228.35,1775.59 2228.35,1488.19 ccw(c2248.03,1488.19) 2248.03,1468.5 2385.83,1468.5 cw(c2385.83,1452.76) 2401.57,1452.76 2401.57,1259.84 ccw(c2417.32,1259.84) 2417.32,1244.09 2531.5,1244.09 cw(c2531.5,1232.28) 2543.31,1232.28 2543.31,1118.11 cw(c2527.56,1118.11) 2527.56,1102.36 2437.01,1102.36 ccw(c2437.01,1078.74) 2413.39,1078.74 2413.39,980.31 cw(c2393.7,980.31) 2393.7,960.63 2082.68,960.63 cw(c2082.68,968.5) 2074.8,968.5 2074.8,980.31 ccw(c2059.06,980.32) 2059.06,996.06 2023.62,996.06 ccw(c2023.62,980.32) 2007.87,980.31 2007.87,968.5 cw(c2000,968.5) 2000,960.63 1855.24,960.63 1855.24,937.01 3000,937.01 ccw(c3000,956.69) 3019.68,956.69 3019.68,1047.24 cw(c3035.43,1047.25) 3035.43,1062.99 3574.8,1062.99
GND on Top Layer "GND_L01_P015" (solid, remove dead copper, pour order 15): 4590.55,740.16 ccw(c4590.55,779.53) 4629.92,779.53 4629.92,1866.14 ccw(c4582.68,1866.14) 4582.68,1913.39 3795.28,1913.39 ccw(c3795.28,1889.76) 3771.65,1889.76 3771.65,1807.09 cw(c3744.09,1807.09) 3744.09,1779.53 3681.1,1779.53 ccw(c3681.1,1740.16) 3641.73,1740.16 3641.73,783.46 ccw(c3685.04,783.46) 3685.04,740.16
GND on Top Layer "GND_L01_P014" (solid, remove dead copper, pour order 14): 2417.32,2960.63 cw(c2448.82,2960.63) 2448.82,2992.13 2862.2,2992.13 ccw(c2862.2,3007.87) 2877.95,3007.87 cw(c2897.64,3007.87) 2897.64,3027.56 3047.24,3027.56 ccw(c3047.24,3051.18) 3070.87,3051.18 3070.87,3492.13 cw(c3094.49,3492.13) 3094.49,3515.75 4137.8,3515.75 cw(c4137.8,3492.13) 4161.42,3492.13 4161.42,2413.39 cw(c4122.05,2413.39) 4122.05,2374.02 2444.88,2374.02 cw(c2444.88,2401.57) 2417.32,2401.57
GND on Top Layer "GND_L01_P013" (solid, remove dead copper, pour order 13): 1732.28,1271.65 1732.28,1330.71 ccw(c1716.54,1330.71) 1716.54,1346.46 1381.89,1346.46 cw(c1381.89,1377.95) 1350.39,1377.95 1350.39,1440.94 ccw(c1322.83,1440.94) 1322.83,1468.5 814.96,1468.5 ccw(c814.96,1448.82) 795.28,1448.82 795.28,933.07 ccw(c822.83,933.07) 822.83,905.51 1500,905.51 cw(c1500,877.95) 1527.56,877.95 1527.56,598.43 ccw(c1562.99,598.43) 1562.99,562.99 1681.1,562.99 ccw(c1681.1,578.74) 1696.85,578.74 1696.85,692.91 ccw(c1673.23,692.91) 1673.23,716.54 1645.67,716.54 cw(c1645.67,736.22) 1625.98,736.22 1625.98,1122.05 cw(c1637.8,1122.05) 1637.8,1133.86 1732.28,1133.86
DGND on Top Layer "DGND_L01_P012" (solid, remove dead copper, pour order 12): 1342.52,1657.48 1342.52,1803.15 2110.24,1803.15 2110.24,2311.02 cw(c2177.17,2311.02) 2177.17,2377.95 2338.58,2377.95 ccw(c2338.58,2440.94) 2401.57,2440.94 2401.57,2964.57 cw(c2440.94,2964.57) 2440.94,3003.94 2847.86,3003.94 ccw(c2847.86,3018.31) 2862.23,3018.31 cw(c2883.29,3018.31) 2883.29,3039.37 3035.43,3039.37 ccw(c3035.43,3059.06) 3055.12,3059.06 3055.12,3500 ccw(c3039.37,3500) 3039.37,3515.75 82.68,3515.75 ccw(c82.68,3488.19) 55.12,3488.19 55.12,2803.15 ccw(c98.42,2803.15) 98.43,2759.84 771.65,2759.84 771.65,1657.48
GND on Top Layer "GND_L01_P011" (solid, remove dead copper, pour order 11): 3759.84,1980.32 ccw(c3759.84,1968.5) 3748.03,1968.5 3748.03,1862.2 cw(c3736.22,1862.2) 3736.22,1850.39 3677.17,1850.39 ccw(c3677.17,1834.65) 3661.42,1834.65 cw(c3629.92,1834.65) 3629.92,1803.15 3609.77,1803.32 cw(c3606.3,1838.62) 3606.3,1803.15 2185.04,1803.15 cw(c2185.04,1850.39) 2137.8,1850.39 2137.8,2303.15 cw(c2192.91,2303.15) 2192.91,2358.27 3858.27,2358.27 cw(c3858.27,2314.96) 3901.57,2314.96 3901.57,2003.94 cw(c3877.95,2003.94) 3877.95,1980.32
AVDD_5V0_R on Top Layer "AVDD_5V0_R_L01_P008" (solid, remove dead copper, pour order 8): 1897.64,885.83 1984.25,885.83 cw(c1984.25,877.95) 1992.13,877.95 1992.13,850.39 ccw(c2000,850.39) 2000,842.52 2118.11,842.52 ccw(c2118.11,854.33) 2129.92,854.33 2129.92,877.95 cw(c2141.73,877.95) 2141.73,889.76 2240.16,889.76 cw(c2240.16,877.95) 2251.97,877.95 2251.97,783.46 cw(c2240.16,783.46) 2240.16,771.65 1996.06,771.65 cw(c1996.06,787.4) 1980.32,787.4 1980.32,850.39 ccw(c1972.44,850.39) 1972.44,858.27 1901.57,858.27 cw(c1901.57,862.2) 1897.64,862.2
AVDD_5V0_L on Top Layer "AVDD_5V0_L_L01_P007" (solid, remove dead copper, pour order 7): 1893.7,1000 1976.38,1000 ccw(c1976.38,1011.81) 1988.19,1011.81 1988.19,1082.68 cw(c2003.94,1082.68) 2003.94,1098.43 2236.22,1098.43 cw(c2236.22,1082.68) 2251.97,1082.68 2251.97,1000 cw(c2232.28,1000) 2232.28,980.31 2145.67,980.31 cw(c2145.67,996.06) 2129.92,996.06 2129.92,1007.87 ccw(c2118.11,1007.87) 2118.11,1019.69 2015.75,1019.69 ccw(c2015.75,1007.87) 2003.94,1007.87 2003.94,988.19 cw(c1992.13,988.19) 1992.13,976.38 1897.64,976.38 cw(c1897.64,980.31) 1893.7,980.31
GND on Top Layer "GND_L01_P006" (solid, remove dead copper, pour order 6): 1854.33,897.64 1854.33,921.26 3000,921.26 cw(c3000,901.58) 3019.68,901.57 3019.68,822.83 ccw(c3043.31,822.83) 3043.31,799.21 3551.18,799.21 cw(c3551.18,787.4) 3562.99,787.4 3562.99,102.36 cw(c3539.37,102.36) 3539.37,78.74 2224.41,78.74 cw(c2224.41,106.3) 2196.85,106.3 2196.85,500 cw(c2228.35,500) 2228.35,531.5 2374.02,531.5 ccw(c2374.02,555.12) 2397.64,555.12 2397.64,606.3 cw(c2421.26,606.3) 2421.26,629.92 2515.75,629.92 ccw(c2515.75,653.54) 2539.37,653.54 2539.37,740.16 ccw(c2515.75,740.16) 2515.75,763.78 2429.13,763.78 cw(c2429.13,787.4) 2405.51,787.4 2405.51,877.95 ccw(c2381.89,877.95) 2381.89,901.57 2098.43,901.57 ccw(c2098.43,889.76) 2086.61,889.76 2086.61,877.95 cw(c2070.87,877.95) 2070.87,862.2 2015.75,862.2 cw(c2015.75,874.02) 2003.94,874.02 2003.94,881.89 ccw(c1988.19,881.89) 1988.19,897.64
GND on Top Layer "GND_L01_P004" (solid, remove dead copper, pour order 4): 1952.76,543.31 cw(c1952.76,527.56) 1968.5,527.56 1968.5,279.53 cw(c1933.07,279.53) 1933.07,244.09 1228.35,244.09 ccw(c1228.35,220.47) 1204.72,220.47 1204.72,133.86 ccw(c1232.28,133.86) 1232.28,106.3 2011.81,106.3 ccw(c2011.81,133.86) 2039.37,133.86 2039.37,527.56 cw(c2055.12,527.56) 2055.12,543.31 2185.04,543.31 ccw(c2185.04,566.93) 2208.66,566.93 2208.66,696.85 ccw(c2185.04,696.85) 2185.04,720.47 2137.8,720.47 ccw(c2137.8,700.79) 2118.11,700.79 2118.11,590.55 cw(c2102.36,590.55) 2102.36,574.8 1952.76,574.8 cw(c1952.76,590.55) 1937.01,590.55 1937.01,633.86 ccw(c1921.26,633.86) 1921.26,649.61 1862.2,649.61 cw(c1862.2,657.48) 1854.33,657.48 1854.33,665.35 ccw(c1846.46,665.35) 1846.46,673.23 1834.65,673.23 cw(c1834.65,681.1) 1826.77,681.1 1826.77,834.65 1803.15,834.65 1803.15,665.35 cw(c1799.21,665.35) 1799.21,661.42 1795.28,661.42 ccw(c1795.27,657.48) 1791.34,657.48 1791.34,559.06 ccw(c1807.09,559.05) 1807.09,543.31
NetC150_1 on Top Layer "NETC150_1_L01_P003" (solid, remove dead copper, pour order 3): 1763.78,791.34 1763.78,685.04 cw(c1755.91,685.04) 1755.91,677.17 1728.35,677.17 ccw(c1728.35,661.42) 1712.6,661.42 1712.6,543.31 cw(c1696.85,543.31) 1696.85,527.56 1228.35,527.56 ccw(c1228.35,511.81) 1212.6,511.81 1212.6,429.13 ccw(c1244.09,429.13) 1244.09,397.64 1917.32,397.64 ccw(c1917.32,421.26) 1940.94,421.26 1940.94,503.94 ccw(c1913.39,503.94) 1913.39,531.5 1807.09,531.5 cw(c1807.09,559.06) 1779.53,559.06 1779.53,661.42 cw(c1787.4,661.42) 1787.4,669.29 ccw(c1787.4,673.23) 1791.34,673.23 1791.34,791.34
GND on Top Layer "GND_L01_P002" (solid, remove dead copper, pour order 2): 1803.15,1031.5 1803.15,1169.29 cw(c1811.02,1169.29) 1811.02,1177.17 1818.9,1177.17 ccw(c1818.9,1185.04) 1826.77,1185.04 1826.77,1342.52 cw(c1838.58,1342.52) 1838.58,1354.33 2102.36,1354.33 ccw(c2102.36,1377.95) 2125.98,1377.95 2125.98,1622.05 ccw(c2102.36,1622.05) 2102.36,1645.67 1405.51,1645.67 cw(c1405.51,1673.23) 1377.95,1673.23 1377.95,1751.97 cw(c1405.51,1751.97) 1405.51,1779.53 2157.48,1779.53 cw(c2157.48,1751.97) 2185.04,1751.97 2185.04,1350.39 ccw(c2212.6,1350.39) 2212.6,1322.83 2216.54,1322.83 cw(c2216.54,1303.15) 2236.22,1303.15 2236.22,1169.29 cw(c2216.54,1169.29) 2216.54,1149.61 2173.23,1149.61 cw(c2173.23,1177.17) 2145.67,1177.17 2145.67,1275.59 ccw(c2125.98,1275.59) 2125.98,1295.28 1984.25,1295.28 ccw(c1984.25,1283.46) 1972.44,1283.46 1972.44,1259.84 cw(c1960.63,1259.84) 1960.63,1248.03 1905.51,1248.03 ccw(c1905.51,1232.28) 1889.76,1232.28 1889.76,1192.91 cw(c1874.02,1192.91) 1874.02,1177.17 1842.52,1177.17 ccw(c1842.52,1161.42) 1826.77,1161.42 1826.77,1031.5
NetC134_2 on Top Layer "NETC134_2_L01_P001" (solid, remove dead copper, pour order 1): 1763.78,1066.93 1763.78,1181.1 ccw(c1755.91,1181.1) 1755.91,1188.98 cw(c1755.91,1196.85) 1748.03,1196.85 1748.03,1346.46 ccw(c1732.28,1346.46) 1732.28,1362.2 1401.57,1362.2 cw(c1401.57,1385.83) 1377.95,1385.83 1377.95,1468.5 cw(c1401.57,1468.5) 1401.57,1492.13 2086.61,1492.13 cw(c2086.61,1472.44) 2106.3,1472.44 2106.3,1385.83 cw(c2082.68,1385.83) 2082.68,1362.2 1822.83,1362.2 ccw(c1822.83,1346.46) 1807.09,1346.46 1807.09,1196.85 cw(c1799.21,1196.85) 1799.21,1188.98 1795.28,1188.98 ccw(c1795.28,1181.1) 1787.4,1181.1 1787.4,1066.93
GND on Top Layer "GND_L01_P000" (solid, remove dead copper, pour order 0): 1649.61,1039.37 1866.14,1039.37 1866.14,822.83 1649.61,822.83
GND on GND "GND_L02_P017" (solid, remove dead copper, pour order 17): 759.84,1539.37 1354.33,1539.37 1354.33,1795.28 2135.83,1795.28 2135.83,2303.15 cw(c2194.88,2303.15) 2194.88,2362.2 2372.05,2362.2 ccw(c2372.05,2411.42) 2421.26,2411.42 2421.26,2952.76 cw(c2460.63,2952.76) 2460.63,2992.13 3031.5,2992.13 ccw(c3031.5,3041.34) 3080.71,3041.34 3080.71,3494.09 cw(c3100.39,3494.09) 3100.39,3513.78 4625.98,3513.78 cw(c4625.98,3484.25) 4655.51,3484.25 4655.51,108.27 cw(c4616.15,108.26) 4616.14,68.9 118.11,68.9 cw(c118.11,147.64) 39.37,147.64 39.37,2677.17 cw(c88.58,2677.17) 88.58,2726.38 759.84,2726.38
DGND on GND "DGND_L02_P016" (solid, remove dead copper, pour order 16): 800.57,1551.18 800.57,2730.92 ccw(c771.66,2730.92) 771.65,2759.84 94.16,2759.84 cw(c94.16,2798.88) 55.12,2798.88 55.12,3490.9 cw(c79.81,3490.9) 79.81,3515.59 3042.88,3515.59 cw(c3042.88,3503.35) 3055.12,3503.35 3055.12,3059.06 cw(c3035.43,3059.05) 3035.43,3039.37 2883.29,3039.37 ccw(c2883.29,3018.31) 2862.23,3018.31 2862.23,3015.45 cw(c2850.72,3015.45) 2850.72,3003.94 2440.94,3003.94 ccw(c2440.94,2964.57) 2401.57,2964.57 2401.57,2434.74 cw(c2344.79,2434.74) 2344.79,2377.95 2177.17,2377.95 ccw(c2177.16,2311.03) 2110.24,2311.02 2110.24,1803.15 1342.52,1803.15 1342.52,1551.18
GND on Bottom Layer "GND_L04_P020" (solid, remove dead copper, pour order 20): 3498.44,1299.15 cw(c3498.44,1269.62) 3527.97,1269.62 3527.97,669.23 cw(c3498.44,669.23) 3498.44,639.7 3153.95,639.7 cw(c3153.95,688.91) 3104.74,688.91 3104.74,1249.94 cw(c3153.95,1249.94) 3153.95,1299.15
GND on Bottom Layer "GND_L04_P026" (solid, remove dead copper, pour order 26): 3838.58,1850.39 4488.19,1850.39 cw(c4488.19,1811.02) 4527.56,1811.02 4527.56,1102.36 cw(c4488.19,1102.36) 4488.19,1062.99 3818.9,1062.99 cw(c3818.9,1102.36) 3779.53,1102.36 3779.53,1791.34 cw(c3838.58,1791.34)
GND on Bottom Layer "GND_L04_P025" (solid, remove dead copper, pour order 25): 3840.43,2713.66 ccw(c3840.43,2674.29) 3801.06,2674.29 3801.06,2073.9 ccw(c3840.43,2073.9) 3840.43,2034.53 4165.24,2034.53 ccw(c4165.24,2064.06) 4194.77,2064.06 4194.77,2674.29 ccw(c4155.4,2674.29) 4155.4,2713.66
GND on Bottom Layer "GND_L04_P024" (solid, remove dead copper, pour order 24): 4637.15,2710.29 cw(c4637.15,2680.77) 4666.68,2680.77 4666.68,2080.37 cw(c4637.15,2080.37) 4637.15,2050.84 4302.5,2050.84 cw(c4302.5,2100.06) 4253.29,2100.06 4253.29,2661.08 cw(c4302.5,2661.08) 4302.5,2710.29
GND on Bottom Layer "GND_L04_P023" (solid, remove dead copper, pour order 23): 777.56,1240.16 cw(c816.93,1240.16) 816.93,1279.53 1338.58,1279.53 cw(c1338.58,1240.16) 1377.95,1240.16 1377.95,964.57 cw(c1348.43,964.57) 1348.43,935.04 816.93,935.04 cw(c816.93,974.41) 777.56,974.41
GND on Bottom Layer "GND_L04_P022" (solid, remove dead copper, pour order 22): 777.56,915.35 1348.43,915.35 cw(c1348.43,885.83) 1377.95,885.83 1377.95,610.24 cw(c1338.58,610.24) 1338.58,570.87 767.72,570.87 cw(c767.72,610.24) 728.35,610.24 728.35,866.14 cw(c777.56,866.14)
GND on Bottom Layer "GND_L04_P021" (solid, remove dead copper, pour order 21): 2153.54,241.14 1604.33,241.14 cw(c1604.33,290.35) 1555.12,290.35 1555.12,615.16 cw(c1604.33,615.16) 1604.33,664.37 2153.54,664.37
GND on Bottom Layer "GND_L04_P019" (solid, remove dead copper, pour order 19): 2322.83,1387.8 ccw(c2311.02,1387.8) 2311.02,1399.61 2281.5,1399.61 cw(c2281.5,1417.32) 2263.78,1417.32 2263.78,1751.97 cw(c2303.15,1751.97) 2303.15,1791.34 2657.48,1791.34 cw(c2657.48,1771.65) 2677.17,1771.65 2677.17,1151.58 cw(c2637.8,1151.57) 2637.8,1112.21 2362.2,1112.21 cw(c2362.2,1151.57) 2322.83,1151.58
GND on Bottom Layer "GND_L04_P018" (solid, remove dead copper, pour order 18): 2178.17,1788.49 cw(c2178.17,1758.96) 2207.69,1758.96 2207.69,1286.52 cw(c2158.48,1286.52) 2158.48,1237.31 1873.05,1237.31 cw(c1873.05,1286.52) 1823.83,1286.52 1823.83,1749.12 cw(c1863.2,1749.12) 1863.2,1788.49

## Keep-outs
Top Layer:
  rectangle: 98.43,-19.68 4606.3,59.06
  rectangle: 78.74,3523.62 4606.3,3602.36

## Silkscreen, mask and mechanical layers (free items; w line width, h text height)
Mechanical 1:
  the board outline again, w7.87

## Dimensions
27.38,3559.06 to 4673.41,3559.06 on Mechanical 1